# Altium PCB GLOVEUNIT_PCB.PcbDoc
Units mil, origin at the board's own origin, x right, y up, seen from the top; angles counter-clockwise.
Board outline 6000 x 4000 mil, 2 copper layers (Top Layer, Bottom Layer); 8 components, 9 nets, 70 pads, 0 vias.
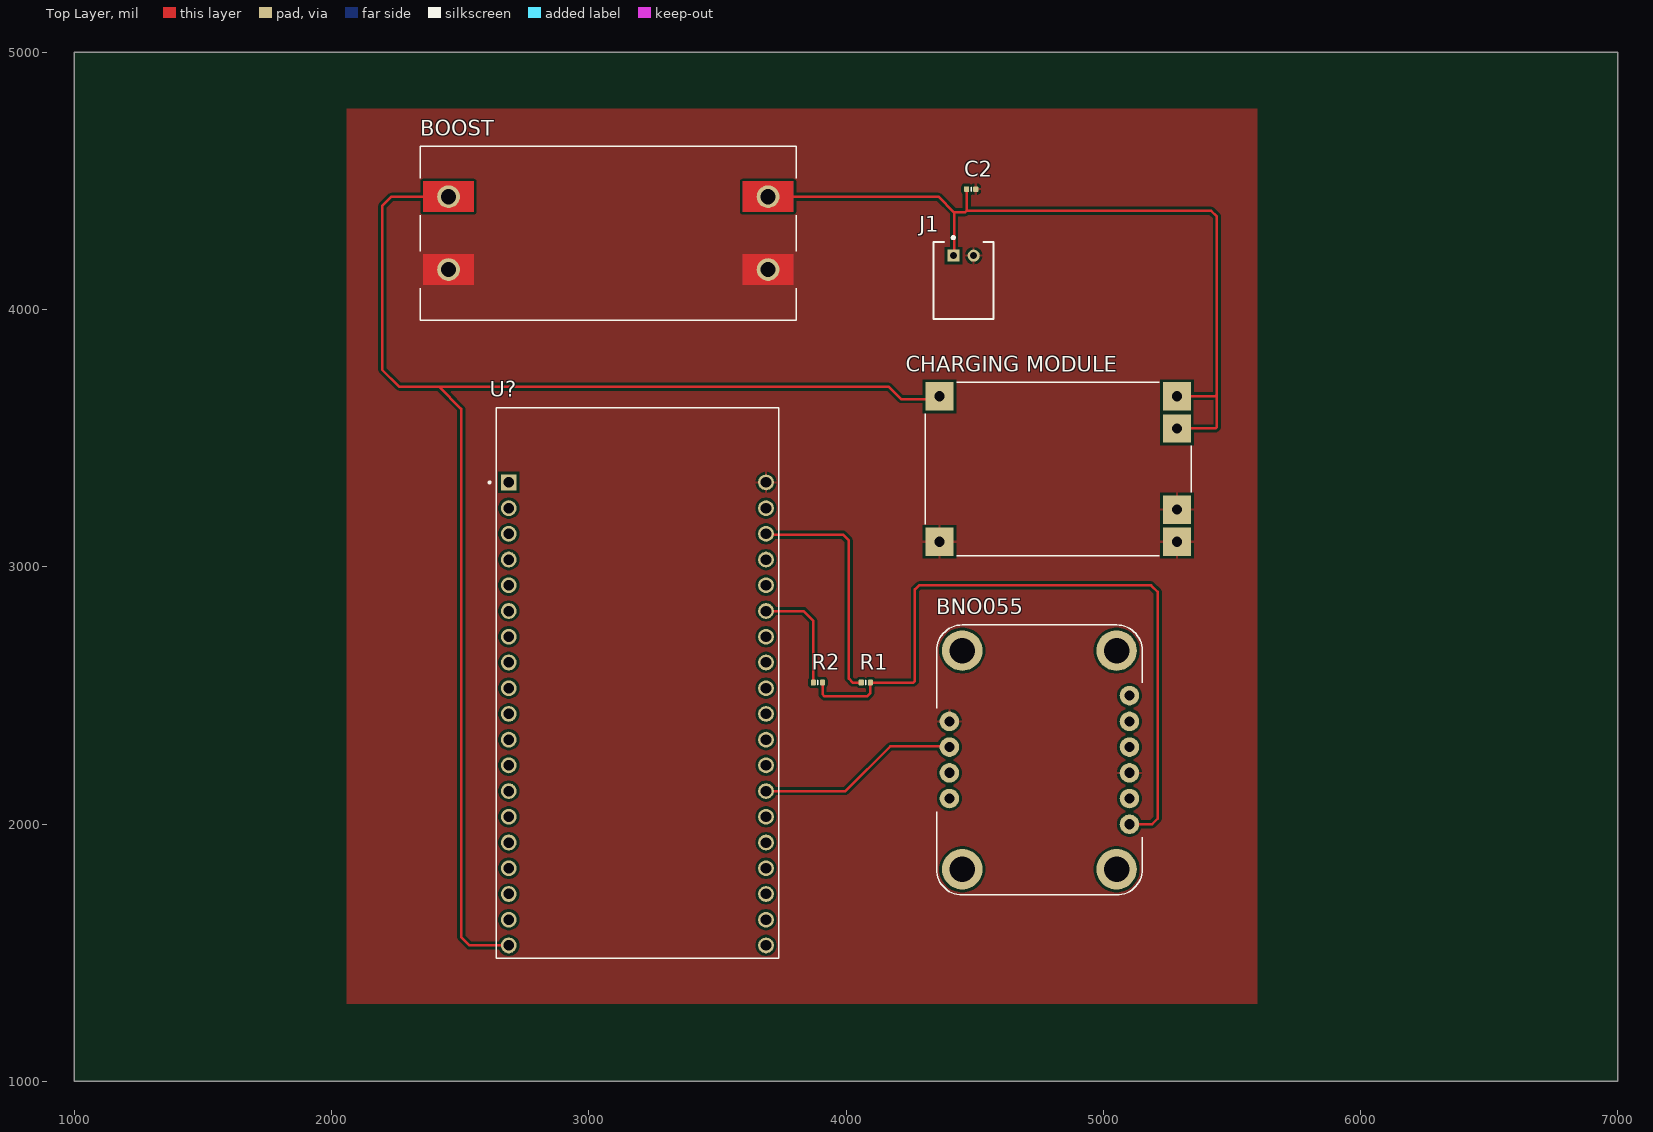
[diagram p0: Top Layer view]
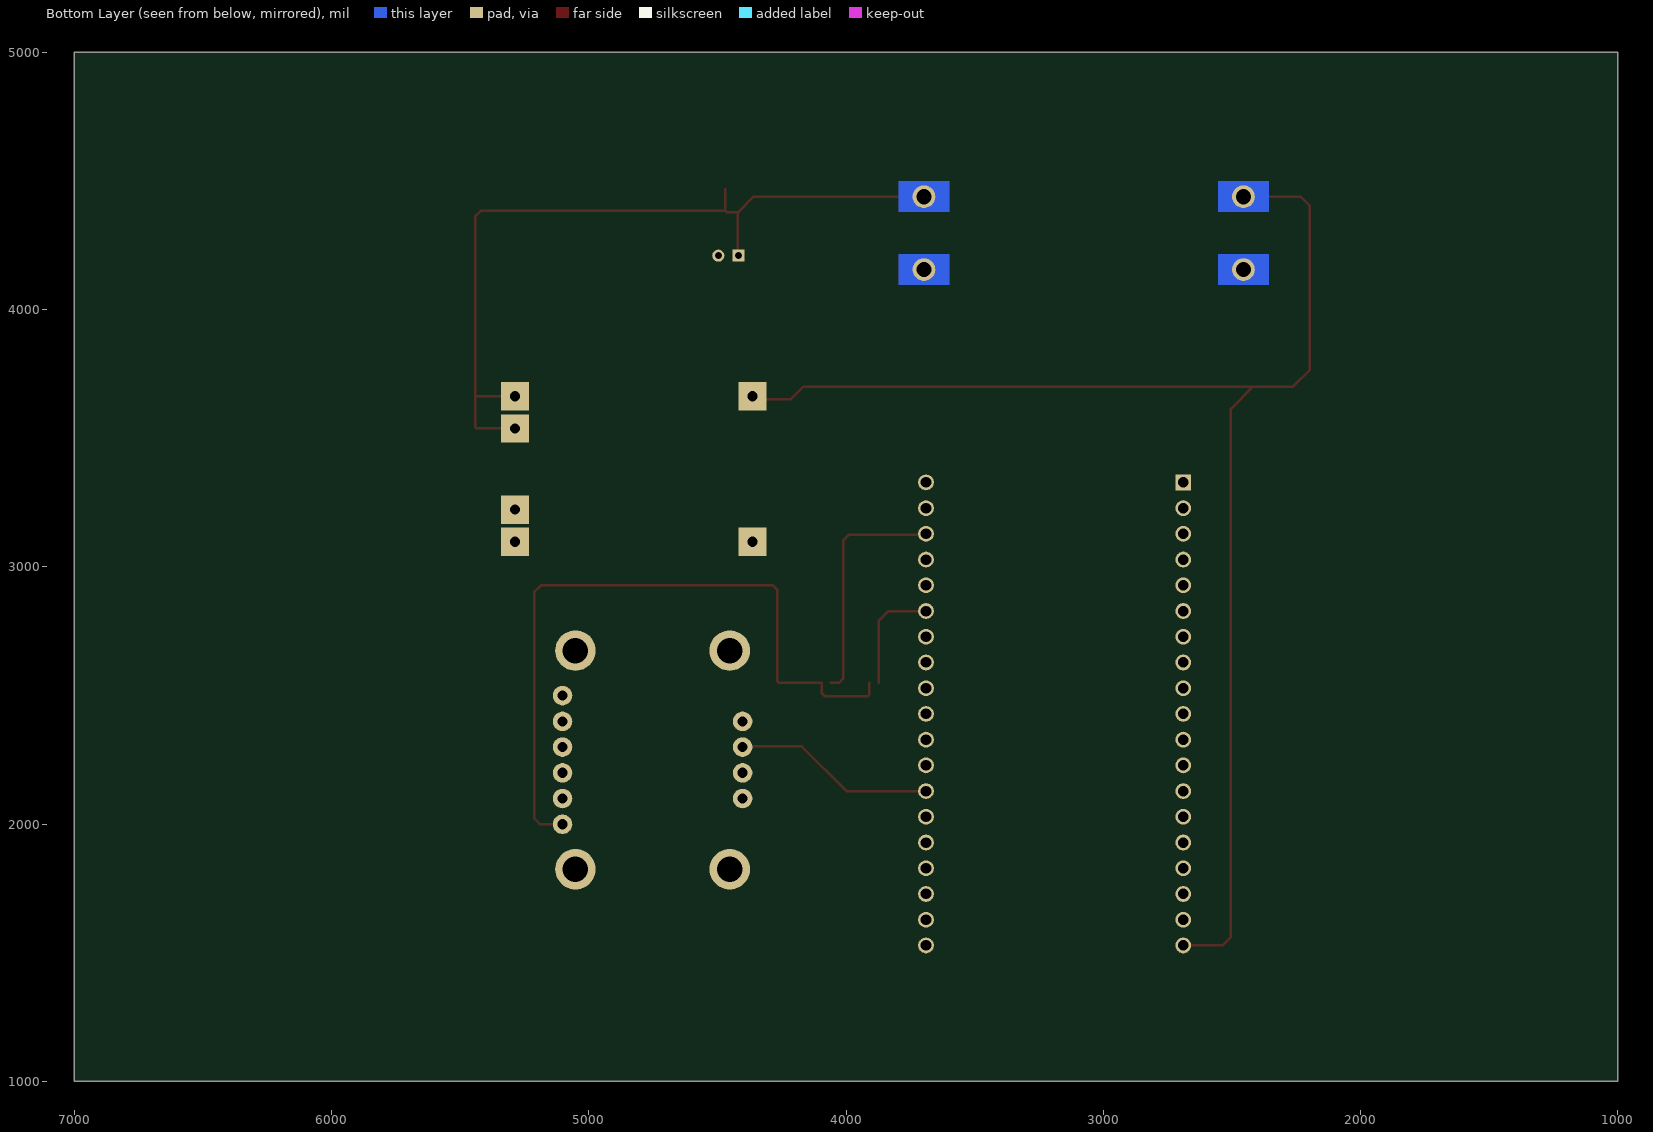
[diagram p1: Bottom Layer view, seen from below]
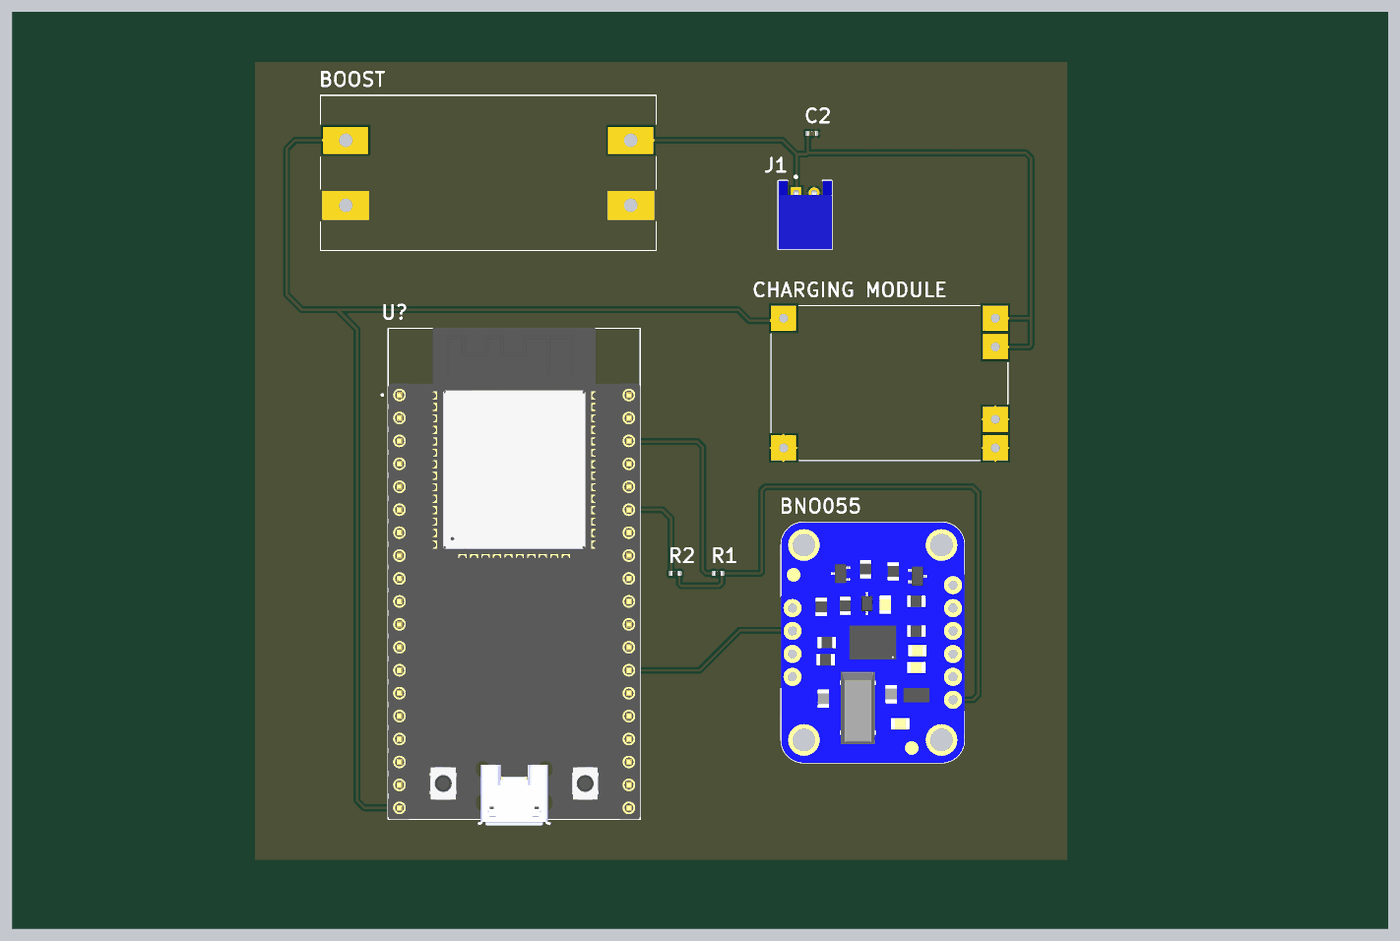
[diagram p2: 3D render of the assembled board from above, using the file's embedded part models]

## Layer stack, top to bottom
Top Solder: solder mask 0.4, Solder Resist, Dk 3.5
Top Layer: signal copper 1.4
Dielectric 1: dielectric 12.6, FR-4, Dk 4.8
Bottom Layer: signal copper 1.4
Bottom Solder: solder mask 0.4, Solder Resist, Dk 3.5

## Board outline
1000,1000 7000,1000 7000,5000 1000,5000

## Design rules (kind name [scope] priority, off if disabled: settings)
Clearance [All] p1: gap=10 ignorepadtopadclearanceinfootprint=FALSE
PolygonConnect [All] p1: connectstyle=Relief reliefconductorwidth=10 reliefentries=4 polygonreliefangle="90 Angle" airgapwidth=10
RoutingVias [All] p1: holewidth=28 width=50 viastyle="Through Hole" minholewidth=28 minwidth=50 maxholewidth=28 maxwidth=50
SolderMaskExpansion [All] p1: expansion=0 istentingtop=FALSE
SupplyNets "Schematic Supply Nets" [InNet('GND')] p1: voltage=0.000
Width [All] p1: maxlimit=19.68 minlimit=7.87 preferedwidth=9.84 minimp=50.000000 maximp=50.000000 favimp=50.000000
30 further rules are at their usual default settings.

## Classes and differential pairs
component class GLOVEUNIT: BNO055 BOOST C2 "CHARGING MODULE" J1 R1 R2

## Components (designator, comment, footprint, x,y, rotation, side; value= is the part's Value field where it differs from the comment)
BNO055 "2472" MODULE_2472 4752,2249 r90 top
BOOST "MT3608" MODULE_MT3608_DC-DC_STEP_UP_CONVERTER_2A_BOOSTER_MODULE 3076,4297 r0 top
C2 "Capacitor 100nF +/-20% 50V 0402" CAPC0402(1005)60_L 4486.72,4468 r0 top value=10µF
"CHARGING MODULE" "TP4056_MICRO-USB_CHARGER_-_1A" MODULE_TP4056_MICRO-USB_CHARGER_-_1A 4825,3380 r0 top
J1 "S2B-PH-K-S(LF)(SN)" JST-S2B-PH-K-S_V 4457,4113 r0 top
R1 "Resistor 22K  +/-1 % 0402 63 mW" RESC0402(1005)_L 4077,2550 r0 top value=4.7K
R2 "Resistor 22K  +/-1 % 0402 63 mW" RESC0402(1005)_L 3891,2550 r0 top value=4.7K
U? "ESP32-DEVKITC-32D" MODULE_ESP32-DEVKITC-32D 3189,2550 r0 top

## Footprints (in the part's own frame and the unit in brackets; to place one, negate y for a bottom-side part, rotate by r counter-clockwise, add the part's x,y. Pads: shape width x height; smd on the part's side, far side on the other; paste and mask are expansions set on the pad)
CAPC0402(1005)60_L [mm] "Chip Capacitor, Body 1.0x0.5mm, Height 0.6mm, IPC High Density"
  rrect25% 0.5x0.55 smd: 1(-0.45,0) 2(0.45,0)
  silkscreen extent 0,-0.2 0,0.2, body extent -0.5,-0.25 0.5,0.25, height 0.6
JST-S2B-PH-K-S_V [mm] "THD, 2-Leads, Body 7.6x5.9mm, Pitch 2mm"
  rect 1.2x1.2 hole 0.7: 1(-1,2.45)
  round 1.2 hole 0.7: 2(1,2.45)
  silkscreen extent -2.95,-3.8 2.95,4.35, body extent -2.95,-3.8 2.95,3.8, height 4.8
MODULE_2472 [mm]
  round 1.93 hole 1: 1(-6.35,-8.89) 2(-3.81,-8.89) 3(-1.27,-8.89) 4(1.27,-8.89) 5(3.81,-8.89) 6(6.35,-8.89) 7(3.81,8.89) 8(1.27,8.89) 9(-1.27,8.89) 10(-3.81,8.89)
  round 4 hole 2.5: SH1(-10.795,-7.62) SH2(10.795,-7.62) SH3(10.795,7.62) SH4(-10.795,7.62)
  silkscreen extent -13.33,-10.16 13.33,10.16, body extent -13.33,-10.16 13.33,10.16, height 4.23
MODULE_ESP32-DEVKITC-32D [mm]
  rect 1.56x1.56 / inner round 1.56 / far side rect 1.56x1.56 hole 1.04: J2-1(-12.7,19.76)
  round 1.56 hole 1.04: J2-2(-12.7,17.22) J2-3(-12.7,14.68) J2-4(-12.7,12.14) J2-5(-12.7,9.6) J2-6(-12.7,7.06) J2-7(-12.7,4.52) J2-8(-12.7,1.98) J2-9(-12.7,-0.56) J2-10(-12.7,-3.1) J2-11(-12.7,-5.64) J2-12(-12.7,-8.18) J2-13(-12.7,-10.72) J2-14(-12.7,-13.26) J2-15(-12.7,-15.8) J2-16(-12.7,-18.34) J2-17(-12.7,-20.88) J2-18(-12.7,-23.42) J2-19(-12.7,-25.96) J3-1(12.7,19.76) J3-2(12.7,17.22) J3-3(12.7,14.68) J3-4(12.7,12.14) J3-5(12.7,9.6) J3-6(12.7,7.06) J3-7(12.7,4.52) J3-8(12.7,1.98) J3-9(12.7,-0.56) J3-10(12.7,-3.1) J3-11(12.7,-5.64) J3-12(12.7,-8.18) J3-13(12.7,-10.72) J3-14(12.7,-13.26) J3-15(12.7,-15.8) J3-16(12.7,-18.34) J3-17(12.7,-20.88) J3-18(12.7,-23.42) J3-19(12.7,-25.96)
  silkscreen extent -14.7,-27.25 13.95,27.15, body extent -13.97,-27.9 13.97,27.2, height 6.69
MODULE_MT3608_DC-DC_STEP_UP_CONVERTER_2A_BOOSTER_MODULE [mm]
  round 2.25 hole 1.5 mask+0: VIN_N(15.775,-3.6) VIN_P(15.775,3.6) VOUT_N(-15.775,-3.6) VOUT_P(-15.775,3.6)
  Top Layer region: -13.275,2.1 -18.275,2.1 -18.275,5.1 -13.275,5.1
  Top Layer region: -13.275,-5.1 -18.275,-5.1 -18.275,-2.1 -13.275,-2.1
  Top Layer region: 18.275,-5.1 13.275,-5.1 13.275,-2.1 18.275,-2.1
  Top Layer region: 18.275,2.1 13.275,2.1 13.275,5.1 18.275,5.1
  Bottom Layer region: -13.275,2.1 -18.275,2.1 -18.275,5.1 -13.275,5.1
  Bottom Layer region: -13.275,-5.1 -18.275,-5.1 -18.275,-2.1 -13.275,-2.1
  Bottom Layer region: 18.275,-5.1 13.275,-5.1 13.275,-2.1 18.275,-2.1
  Bottom Layer region: 18.275,2.1 13.275,2.1 13.275,5.1 18.275,5.1
  silkscreen extent -18.57,-8.6 18.57,8.6
MODULE_TP4056_MICRO-USB_CHARGER_-_1A [mm]
  rect 2.79x2.79 / inner round 2.79 / far side rect 2.79x2.79 hole 1 mask+0.102: BAT_N(11.725,-4.01) BAT_P(11.725,4.01) IN_N(-11.725,-7.18) IN_P(-11.725,7.18) OUT_N(11.725,-7.18) OUT_P(11.725,7.18)
  silkscreen extent -13.12,-8.57 13.12,8.57
RESC0402(1005)_L [mm] "Chip Resistor, Body 1.0x0.5mm, IPC High Density"
  rrect25% 0.5x0.55 smd: 1(-0.45,0) 2(0.45,0)
  silkscreen extent 0,-0.2 0,0.2, body extent -0.5,-0.25 0.5,0.25, height 0.3

## Part data
BNO055: library part CMP-015-000000-1, "Adafruit 9-DOF Absolute Orientation IMU Fusion Breakout - BNO055", Package="Non-Standard Adafruit", Check_prices=https://www.snapeda.com/parts/2472/Adafruit+Industries/view-part/?ref=eda, Component Type=Standard, Design Item ID=2472, MF=Adafruit, MP=2472, Pin Count=10, SnapEDA_Link=https://www.snapeda.com/parts/2472/Adafruit+Industries/view-part/?ref=snap, Source=2472.SchLib
BOOST: library part CMP-013-000000-1, "MT3608-based step-up converter boosts 2Vâ€“24V input to 28V with up to 93% efficiency. Suitable for devices needing higher voltage than the source.", Package=Package, Check_prices=https://www.snapeda.com/parts/MT3608%20DC-DC%20Step%20Up%20Converter%202A%20Booster%20Module/Generic/view-part/?ref=eda, Component Type=Standard, Design Item ID=MT3608_DC-DC_STEP_UP_CONVERTER_2A_BOOSTER_MODULE, MF=Generic, MP="MT3608 DC-DC Step Up Converter 2A Booster Module", Pin Count=4, SnapEDA_Link=https://www.snapeda.com/parts/MT3608%20DC-DC%20Step%20Up%20Converter%202A%20Booster%20Module/Generic/view-part/?ref=snap, Source=MT3608_DC-DC_STEP_UP_CONVERTER_2A_BOOSTER_MODULE.SchLib
C2: library part CMP-001-00067-3, "Chip Capacitor, 100nF +/-20%, 50V, 0402, Thickness 0.6 mm", Case/Package=0402, Max Operating Temperature=85°C, Min Operating Temperature=-55°C, Tolerance=10%, Voltage Rating=50V, Mounting Technology=SMT, Pins=2
"CHARGING MODULE": library part CMP-017-000000-1, "The TP4056ES Li-Ion micro USB charger is an improved version of the TP4056, ideal for 18650 batteries, with a micro USB connection for direct PC charging.", Package=Package, Check_prices=https://www.snapeda.com/parts/TP4056%20Micro-USB%20Charger%20-%201A/Generic/view-part/?ref=eda, Component Type=Standard, Design Item ID=TP4056_MICRO-USB_CHARGER_-_1A, MF=Generic, MP="TP4056 Micro-USB Charger - 1A", Pin Count=6, SnapEDA_Link=https://www.snapeda.com/parts/TP4056%20Micro-USB%20Charger%20-%201A/Generic/view-part/?ref=snap, Source=TP4056_MICRO-USB_CHARGER_-_1A.SchLib
J1: library part CMP-002-00030-2, "Male Header, Pitch 2 mm, 1 x 2 Position, Height 4.8 mm, Tail Length 3.4 mm, -25 to 85 degC, RoHS, Bulk", Case/Package=S2B-PH-K-S, Manufacturer="Japan Solderless Terminals", Max Operating Temperature=85°C, Min Operating Temperature=-25°C, Package Description="Male Header, Pitch 2 mm, 1 x 2 Position, Height 4.8 mm, Tail Length 3.4 mm", Connector Type=Header, Datasheet URL=http://www.jst-mfg.com/product/pdf/eng/ePH.pdf, Datasheet Version=Dec-12, Gender=Male, Mounting Technology=SM, Package Reference=S2B-PH-K-S, RoHS Compliant=Unknown
R1 R2: library part CMP-009-00123-3, "Chip Resistor, 22 kOhms, +/-1 %, 63 mW, -55 to 155 degC, 0402", Case/Package=0402, Max Operating Temperature=155°C, Min Operating Temperature=-55°C, Power=63mW, Tolerance=1%, Pins=2
U?: library part CMP-009-000000-1, "WiFi Development Tools (802.11) ESP32 General Development Kit, ESP32-WROOM-32D on the board", Package=None, Check_prices=https://www.snapeda.com/parts/ESP32-DEVKITC-32D/Espressif+Systems/view-part/?ref=eda, Component Type=Standard, Design Item ID=ESP32-DEVKITC-32D, MF="Espressif Systems", MP=ESP32-DEVKITC-32D, Pin Count=38, SnapEDA_Link=https://www.snapeda.com/parts/ESP32-DEVKITC-32D/Espressif+Systems/view-part/?ref=snap, Source=ESP32-DEVKITC-32D.SchLib

## Nets (pads, with @x,y where several pads share a name; then routed paths per layer and width w, separated by ;. In a path a pad name is that pad's centre, name@x,y a point inside that pad or via, vN(x,y) a via of type N, cw(c..) or ccw(c..) an arc to the next point about the centre after c; other vN are vias at no path point)
3V3: BNO055.1 R1.2 R2.2 | length 2775.1
  Top Layer w9.84: R2.2 3908.72,2504.28 3917,2496 4082,2496 4094.72,2508.72 R1.2 4262.23,2550 4268,2555.77 4268,2912 4284,2928 5186,2928 5212,2902 5212,2021 5190,1999 BNO055.1
5V: "CHARGING MODULE.IN_P" BOOST.VOUT_P U?.J2-19 | length 5501.1
  Top Layer w9.84: BOOST.VOUT_P 2233.73,4438.73 2197,4402 2197,3766 2263,3700 2418,3700 ; U?.J2-19 2536.05,1527.95 2504,1560 2504,3614 2418,3700 ; 4363.39,3662.68 4352.71,3652 4214,3652 4166,3700 2418,3700
BAT+: "CHARGING MODULE.BAT_P" "CHARGING MODULE.OUT_P" BOOST.VIN_P C2.1 J1.1 | length 3167.8
  Top Layer w9.84: BOOST.VIN_P 4359.27,4438.73 4420,4378 ; J1.1@4420,4209.46 4420,4378 ; C2.1 4469,4384 ; 5286.61,3537.87 5435.87,3537.87 5442,3544 5442,3656 5442,3669.44 ; 5286.61,3662.68 5435.23,3662.68 5442,3669.44 ; 4420,4378 4463,4378 4469,4384 ; 4469,4384 5419,4384 5442,4361 5442,3669.44
GND: "CHARGING MODULE.BAT_N" "CHARGING MODULE.IN_N" "CHARGING MODULE.OUT_N" BNO055.3 BNO055.7 BOOST.VIN_N BOOST.VOUT_N C2.2 J1.2 U?.J3-1
IO04: BNO055.8 U?.J3-13 | length 786.3
  Top Layer w9.84: U?.J3-13 3997.95,2127.95 4172,2302 4399,2302 BNO055.8
IO21: BNO055.4
IO22: BNO055.5
NetR1_1: R1.1 U?.J3-3 | length 924.2
  Top Layer w9.84: U?.J3-3 3691.95,3125 3988,3125 4011,3102 4011,2565 4026,2550 R1.1
NetR2_1: R2.1 U?.J3-6 | length 439.8
  Top Layer w9.84: U?.J3-6 3835.05,2827.95 3873,2790 3873,2550.28 R2.1
pads on no net: BNO055.2 BNO055.6 BNO055.9 BNO055.10 BNO055.SH1 BNO055.SH2 BNO055.SH3 BNO055.SH4 U?.J2-1 U?.J2-2 U?.J2-3 U?.J2-4 U?.J2-5 U?.J2-6 U?.J2-7 U?.J2-8 U?.J2-9 U?.J2-10 U?.J2-11 U?.J2-12 U?.J2-13 U?.J2-14 U?.J2-15 U?.J2-16 U?.J2-17 U?.J2-18 U?.J3-2 U?.J3-4 U?.J3-5 U?.J3-7 U?.J3-8 U?.J3-9 U?.J3-10 U?.J3-11 U?.J3-12 U?.J3-14 U?.J3-15 U?.J3-16 U?.J3-17 U?.J3-18 U?.J3-19

## Polygon pours and split planes (outlines as drawn)
GND on Top Layer "NONET_L-01_P-001" (solid, pour order 0): 2060,4781 5599,4781 5599,1301 2060,1301

## Silkscreen, mask and mechanical layers (free items; w line width, h text height)
Mechanical 1:
  lines w10: 2060,1301 5599,1301 5599,4781 2060,4781 2060,1301

## Text inside footprints (layer, text, board x,y; h text height)
BOOST: Mechanical 13 "VIN_P" at 3587.81,4523.38 h50; Mechanical 13 "VIN_N" at 3587.81,4021.41 h50; Mechanical 13 "VOUT_P" at 2367.34,4523.38 h50; Mechanical 13 "VOUT_N" at 2367.34,4021.41 h50
"CHARGING MODULE": Mechanical 13 "IN_P" at 4450.98,3635.91 h50; Mechanical 13 "IN_N" at 4450.98,3065.04 h50; Mechanical 13 "OUT_P" at 4972.64,3635.91 h50; Mechanical 13 "BAT_P" at 4972.64,3517.8 h50; Mechanical 13 "BAT_N" at 4972.64,3202.83 h50; Mechanical 13 "OUT_N" at 4972.64,3074.88 h50